# Altium PCB task1.PcbDoc (part 1 of 2)
Units mil, origin at the board's own origin, x right, y up, seen from the top; angles counter-clockwise.
Board outline 13280 x 12290 mil, 2 copper layers (Top Layer, Bottom Layer); 143 components, 138 nets, 540 pads, 213 vias.
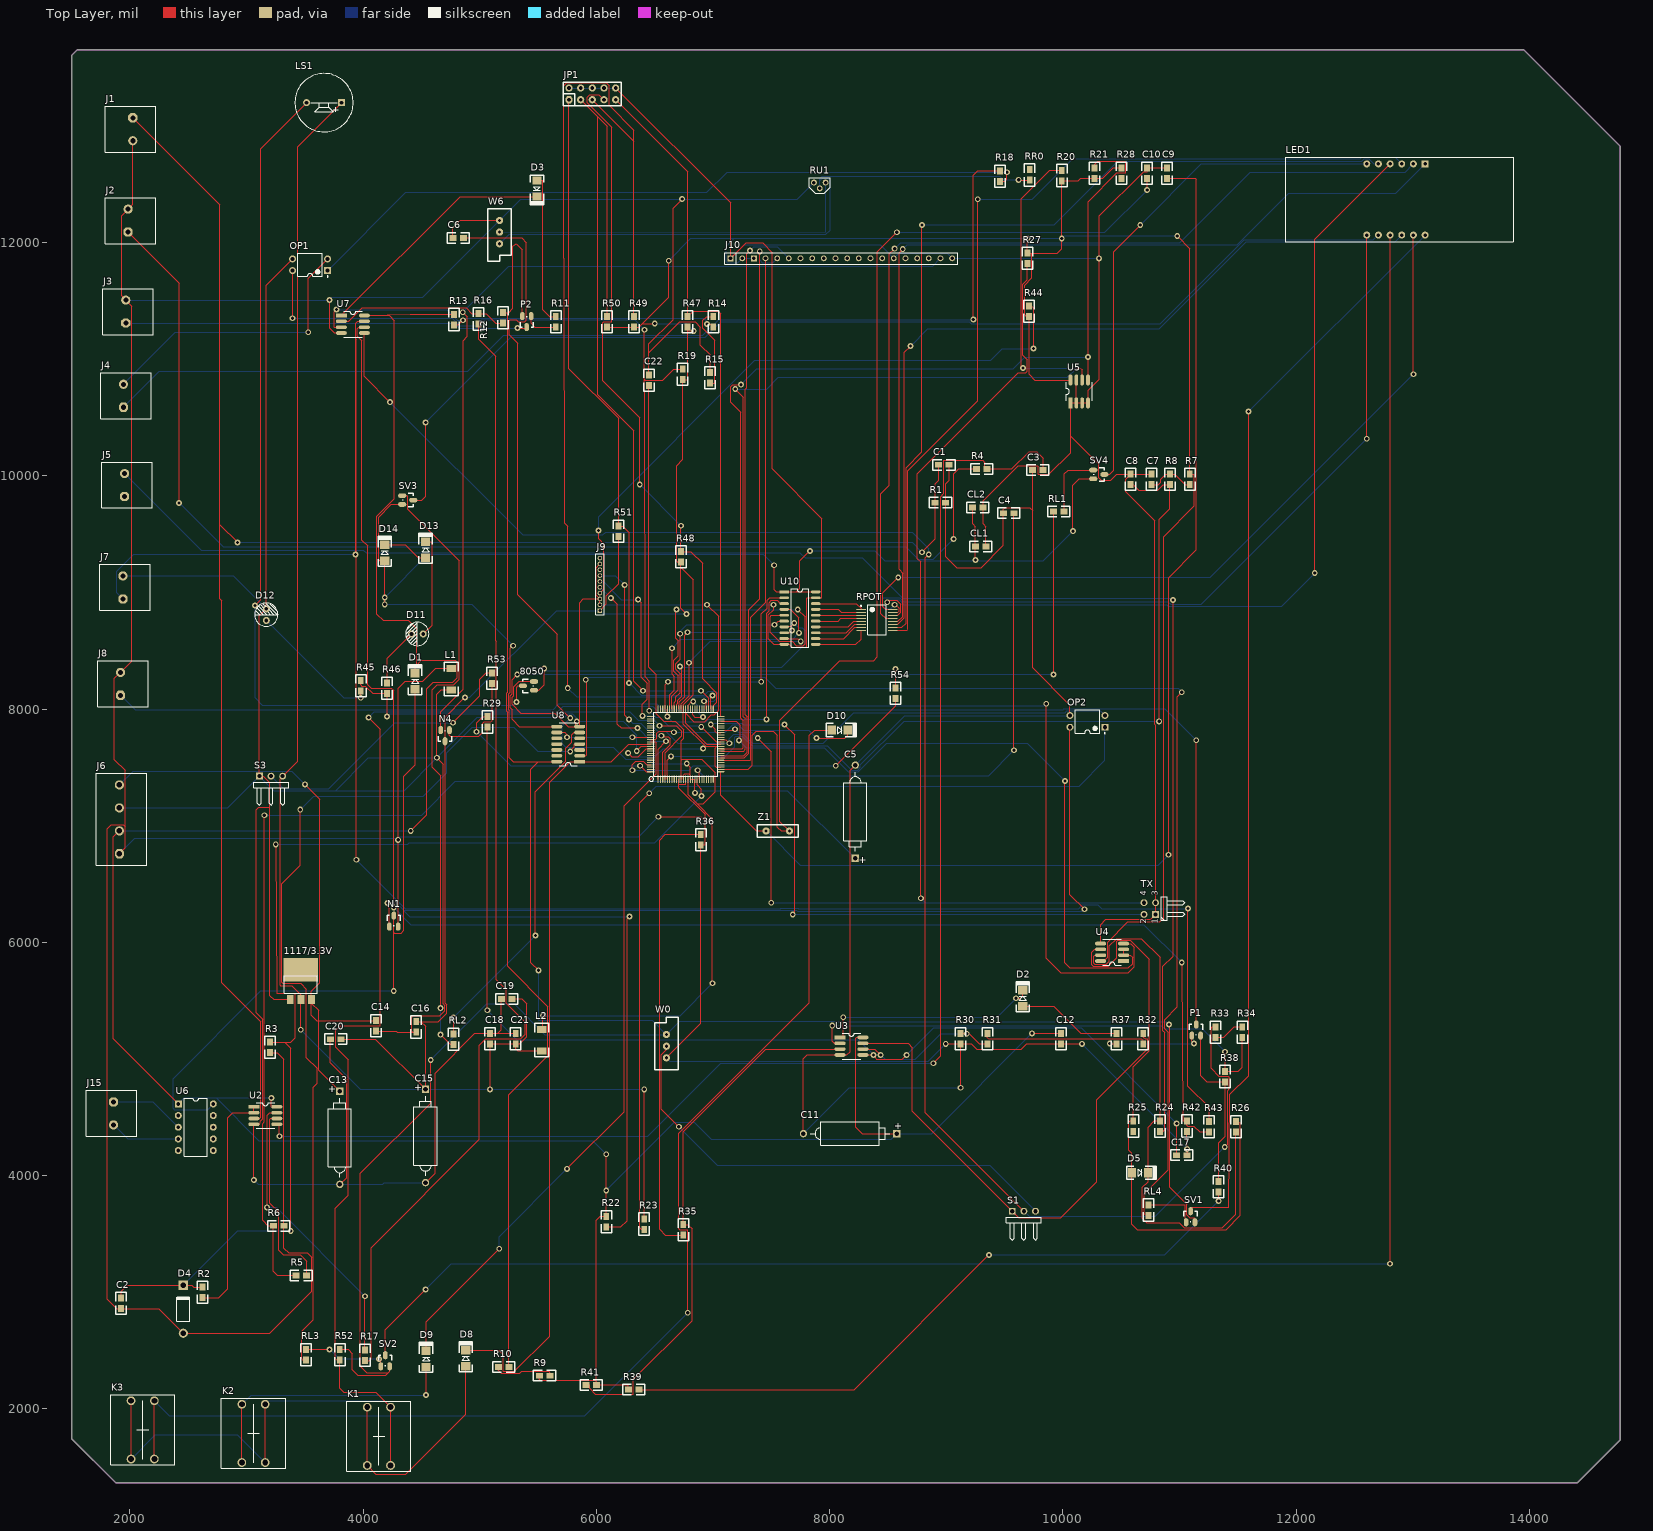
[diagram p0: Top Layer view]
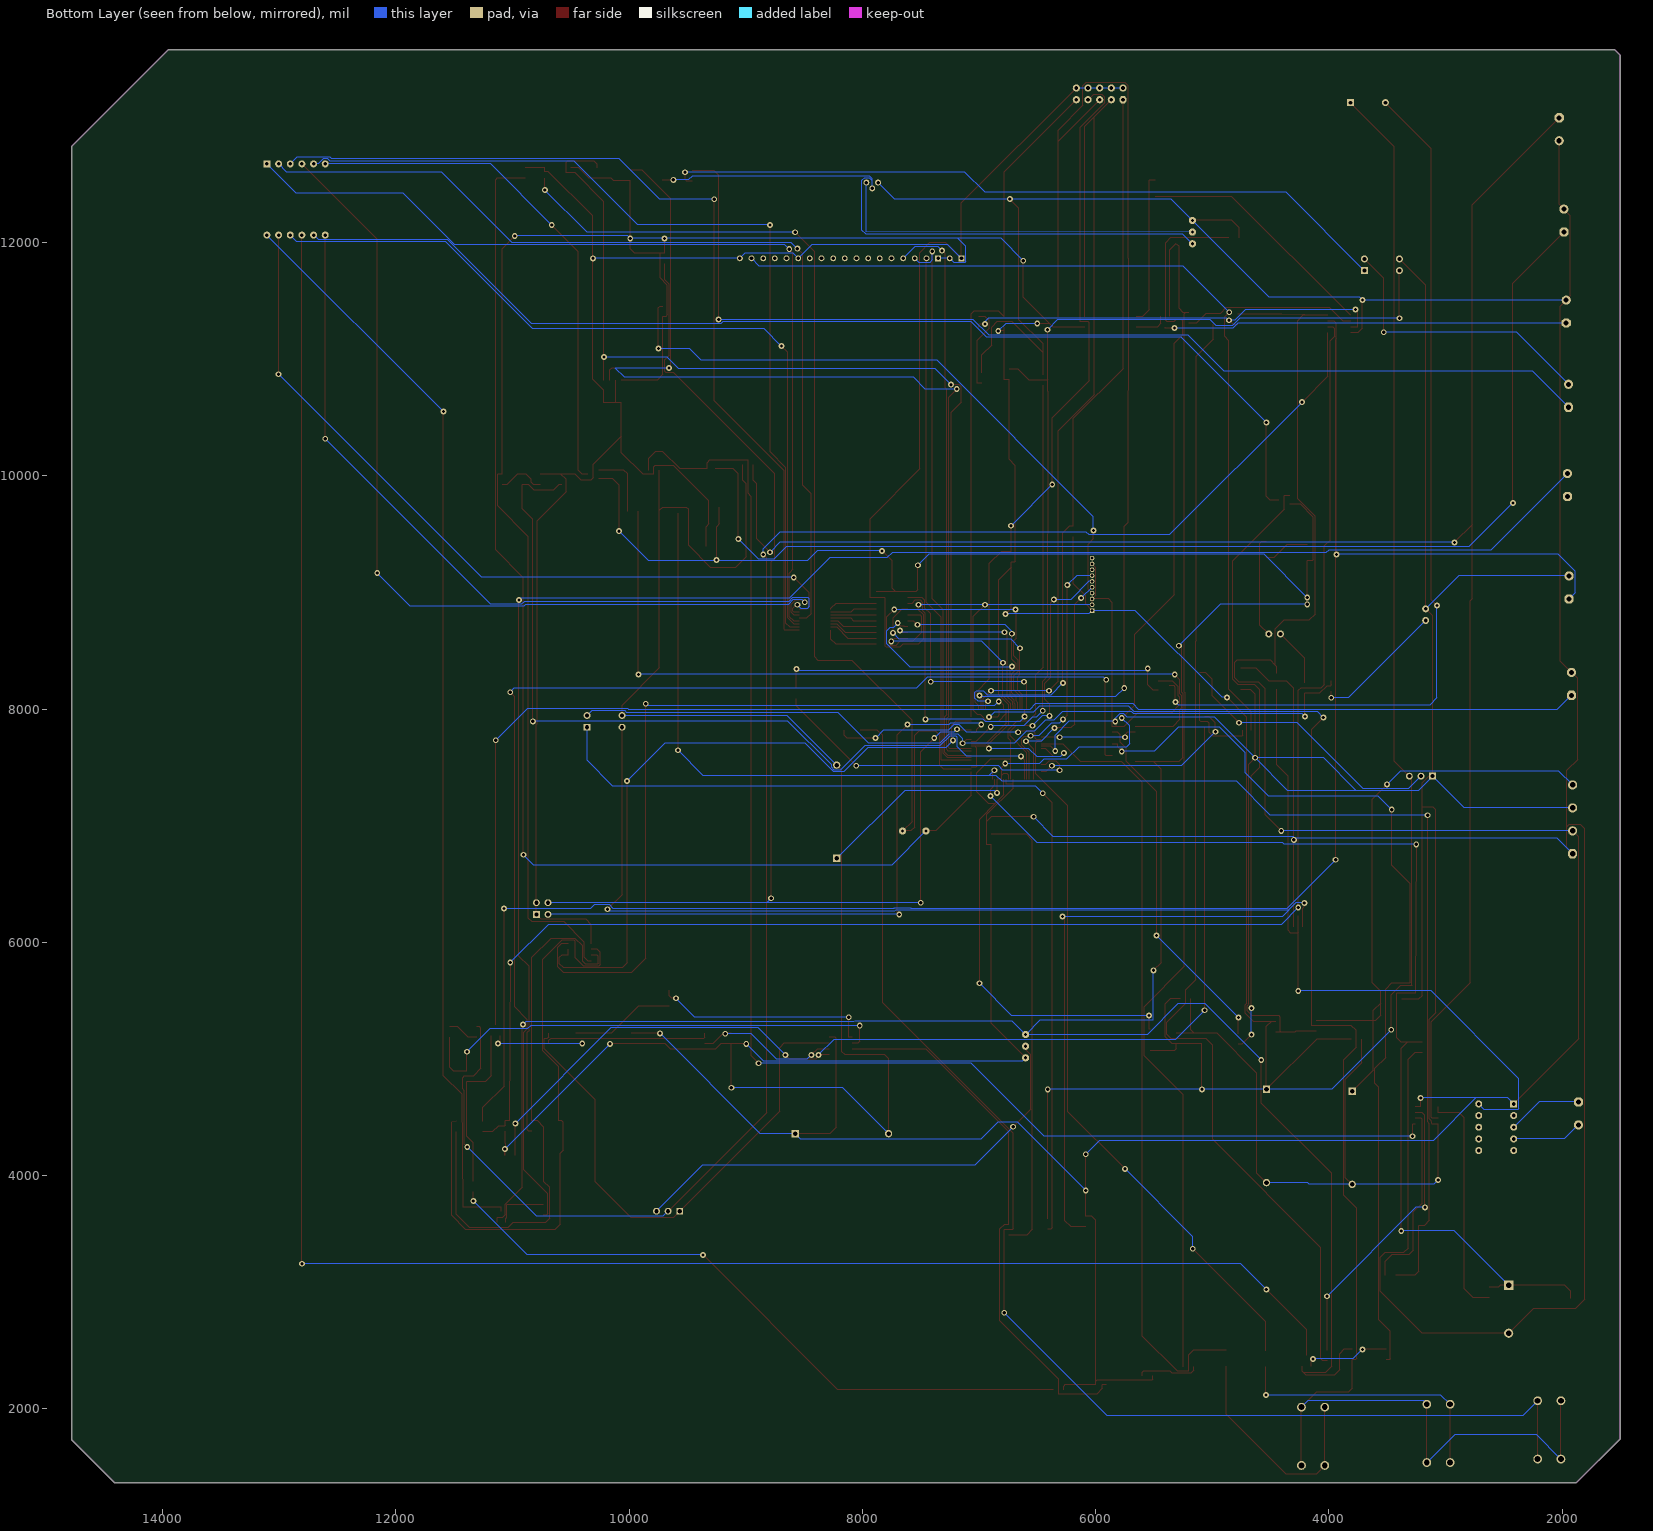
[diagram p1: Bottom Layer view, seen from below]

## Layer stack, top to bottom
Top Solder: solder mask 0.4, Solder Resist, Dk 3.5
Top Layer: signal copper 1.4
Dielectric 1: dielectric 12.6, FR-4, Dk 4.8
Bottom Layer: signal copper 1.4
Bottom Solder: solder mask 0.4, Solder Resist, Dk 3.5

## Board outline
1500,1745 1880,1365 14410,1365 14780,1735 14780,12825 13950,13655 1550,13655 1500,13605

## Design rules (kind name [scope] priority, off if disabled: settings)
Clearance [All] p1: gap=10 ignorepadtopadclearanceinfootprint=FALSE except(0: Arc-Hole Track-Hole SMDPad-Hole THPad-Hole Via-Hole Fill-Hole Poly-Hole Region-Hole Text-Hole)
PolygonConnect [All] p1: connectstyle=Relief reliefconductorwidth=10 reliefentries=4 polygonreliefangle="90 Angle" airgapwidth=10
RoutingVias [All] p1: holewidth=28 width=50 viastyle="Through Hole" minholewidth=28 minwidth=50 maxholewidth=28 maxwidth=50
SolderMaskExpansion [All] p1: expansion=4 istentingtop=FALSE
Width [All] p1: maxlimit=5 minlimit=5 preferedwidth=5 minimp=50.000000 maximp=50.000000 favimp=50.000000
30 further rules are at their usual default settings.

## Components (designator, comment, footprint, x,y, rotation, side; value= is the part's Value field where it differs from the comment)
1117/3.3V "HEADER 3" SOT-223/P2.3 3375.12,5511.47 r0 top
8050 "NPN" SOT-23 5375,8200 r90 top
C1 "104" 0805 8935,10095 r0 top
C2 "104" 0805 1924.82,2949.99 r270 top
C3 "104" 0805 9829.99,10050.18 r180 top
C4 "104" 0805 9579.99,9680.18 r180 top
C5 "Cap Pol2" POLAR0.8 8220,7120 r270 top value=4.7uF
C6 "Cap" 0805 4770.01,12039.82 r0 top value=104
C7 "104" 0805 10760.18,9925.01 r90 top
C8 "104" 0805 10578.15,9925.01 r90 top
C9 "22pF" 0805 10891.85,12639.99 r270 top
C10 "22pF" 0805 10721.85,12639.99 r270 top
C11 "Cap Pol1" POLAR0.8 8175,4360 r0 top value=100uF/25V
C12 "Cap" 0805 9983.15,5130.01 r90 top value=104
C13 "Cap Pol2" POLAR0.8 3800,4325 r90 top value="100pF 16V"
C14 "104" 0805 4109.82,5329.99 r270 top
C15 "Cap Pol2" POLAR0.8 4535,4340 r90 top value="100uF 16V"
C16 "104" 0805 4454.82,5319.99 r270 top
C17 "102" 0805 10975.01,4174.82 r0 top
C18 "104" 0805 5088.15,5130.01 r90 top
C19 "104" 0805 5274.99,5515.18 r180 top
C20 "104" 0805 3809.99,5170.18 r180 top
C21 "104" 0805 5308.15,5130.01 r90 top
C22 "104" 0805 6450.18,10775.01 r90 top
CL1 "104" 0805 9250.01,9394.82 r0 top
CL2 "104" 0805 9225.01,9729.82 r0 top
D1 "4148" D-DO214AC 4445,8170 r90 top
D2 "4148" D-DO214AC 9655.19,5452.08 r90 top
D3 "4148" D-DO214AC 5489.81,12532.92 r270 top
D4 "IN4732" DO-41 2458.15,2855.01 r90 top
D5 "P6KE12AC" D-DO214AC 10592.08,4024.81 r0 top
D8 "4148" D-DO214AC 4880,2365 r90 top
D9 "4148" D-DO214AC 4540,2360 r90 top
D10 "4148" D-DO214AC 8017.08,7819.81 r0 top
D11 "LED(M3)" LED 4515,8645 r180 top
D12 "LED(M3)" LED 3170,8760 r90 top
D13 "4148" D-DO214AC 4535.19,9297.08 r90 top
D14 "4148" D-DO214AC 4185.19,9272.08 r90 top
J1 "接线座" MIP-2 2025,13070 r0 top
J2 "接线座" MIP-2 1985,12090 r180 top
J3 "接线座" MIP-2 1965,11310 r180 top
J4 "接线座" MIP-2 1945,10588.15 r180 top
J5 "CON2" MIP-2 1955,9823.15 r180 top
J6 "CON4" MIP-4 1910,6760 r180 top
J7 "12V OUT" MIP-2 1940,8945 r180 top
J8 "CON2" MIP-2 1920,8118.15 r180 top
J9 "JTAG" MHDR1X10 6030,8845 r90 top
J10 "CON20" SIP20 7150,11865 r0 top
J15 "接线座" MIP-2 1860,4631.85 r0 top
JP1 "IDC10" IDC-10 5765,13225.02 r0 top
K1 "SW-DPST" KEY 6235.13,1515.29 r90 top
K2 "SW-DPST" KEY 5160.13,1540.29 r90 top
K3 "SW-DPST" KEY 9.87,2069.71 r270 top
L1 "500mA磁珠" 1808 4755,8165 r90 top
L2 "500mA磁珠" 1808 5530,5070 r90 top
LED1 "REDCC" SX1 13104.56,12065.73 r270 top
LS1 "SPEAKER" FMQ 3814.81,13200.19 r180 top
N1 "8050" SOT-23 4263.19,6224.81 r0 top
N4 "8050" SOT-23 4701.81,7730.19 r180 top
OP1 "TLP251" DIP-4 3545,11810 r180 top
OP2 "TLP251-1" DIP-4 10210,7895 r180 top
P1 "8550" SOT-23 11143.15,5290.01 r0 top
P2 "8550" SOT-23 5401.81,11280.19 r180 top
R1 "250" 0805 8994.99,9770.18 r180 top
R2 "1K" 0805 2623.15,2955.01 r90 top
R3 "1K" 0805 3200.18,5055.01 r90 top
R4 "1K" 0805 9260.01,10059.82 r0 top
R5 "1K" 0805 3514.99,3145.18 r180 top
R6 "910" 0805 3319.99,3570.18 r180 top
R7 "10K" 0805 11088.15,9925.01 r90 top
R8 "1K" 0805 10918.15,9925.01 r90 top
R9 "0.5" 0805 5599.99,2285.18 r180 top
R10 "62" 0805 5249.99,2360.18 r180 top
R11 "5.1K" 0805 5651.85,11364.99 r270 top
R12 "10K" 0805 5200.18,11310.01 r90 top
R13 "10K" 0805 4780.18,11295.01 r90 top
R14 "39K" 0805 7001.85,11364.99 r270 top
R15 "1K" 0805 6975,10885 r270 top
R16 "39K" 0805 4989.82,11389.99 r270 top
R17 "1K" 0805 4015.18,2415.01 r90 top
R18 "2K" 0805 9459.82,12614.99 r270 top
R19 "2K" 0805 6740.18,10825.01 r90 top
R20 "3K3" 0805 9989.82,12619.99 r270 top
R21 "3.3K" 0805 10271.85,12639.99 r270 top
R22 "3.3K" 0805 6085.18,3560.01 r90 top
R23 "510" 0805 6410.18,3540.01 r90 top
R24 "10" 0805 10833.15,4380.01 r90 top
R25 "10" 0805 10603.15,4380.01 r90 top
R26 "220" 0805 11483.15,4375.01 r90 top
R27 "5K1" 0805 9695,11910 r270 top
R28 "5K1" 0805 10501.85,12639.99 r270 top
R29 "1k" 0805 5064.82,7934.99 r270 top
R30 "10k" 0805 9123.15,5130.01 r90 top
R31 "2K" 0805 9353.15,5130.01 r90 top
R32 "10K" 0805 10688.15,5130.01 r90 top
R33 "39k" 0805 11308.15,5185.01 r90 top
R34 "1k" 0805 11538.15,5185.01 r90 top
R35 "39K" 0805 6745.18,3490.01 r90 top
R36 "1K" 0805 6895.18,6835.01 r90 top
R37 "5.1K" 0805 10458.15,5130.01 r90 top
R38 "10K" 0805 11390.18,4805.01 r90 top
R39 "0.5" 0805 6275.01,2164.82 r0 top
R40 "62.5" 0805 11335.18,3860.01 r90 top
R41 "10K" 0805 5910.01,2204.82 r0 top
R42 "2.2K" 0805 11063.15,4380.01 r90 top
R43 "3K" 0805 11253.15,4375.01 r90 top
R44 "4.7K" 0805 9709.82,11454.99 r270 top
R45 "1K" 0805 3980,8245 r270 top
R46 "1K" 0805 4205.18,8135.01 r90 top
R47 "5K1" 0805 6781.85,11364.99 r270 top
R48 "5K1" 0805 6724.82,9349.99 r270 top
R49 "5K1" 0805 6321.85,11364.99 r270 top
R50 "5K1" 0805 6091.85,11364.99 r270 top
R51 "5K1" 0805 6189.82,9569.99 r270 top
R52 "10K" 0805 3800.18,2420.01 r90 top
R53 "1K" 0805 5104.82,8309.99 r270 top
R54 "1k" 0805 8565.18,8090.01 r90 top
RL1 "1.3K" 0805 9920.01,9694.82 r0 top
RL2 "1.3K" 0805 4774.82,5214.99 r270 top
RL3 "1.3K" 0805 3510.18,2420.01 r90 top
RL4 "1.3K" 0805 10735.18,3660.01 r90 top
RPOT "Res Pack4" SSOP16_N 8405,8765 r0 top value=330
RR0 "1K/0.5V" 0805 9714.82,12624.99 r270 top
RU1 "LM336/2.5V" TO-92A 7865,12515 r0 top
S1 "SW3" HDR1x3H 9565,3695 r0 top
S3 "CON3" HDR1x3H 3110,7425 r0 top
SV1 "9012" SOT-23 11095,3690 r0 top
SV2 "9012" SOT-23 4190,2455 r0 top
SV3 "9012" SOT-23 4424.81,9791.81 r270 top
SV4 "9012" SOT-23 10349.81,10011.81 r270 top
TX "IDC4" HDR2x2H 10795,6240 r90 top
U2 "LM358" SO8 3063.15,4590.01 r0 top
U3 "LM358" SO8 8088.15,5185.01 r0 top
U4 "MAX3485" SO8 10520,5839.99 r180 top
U5 "24C02" SO8 10064.99,10625 r90 top
U6 "RELAY(12V)" DIP10 2415,4615 r0 top
U7 "LM358" SO8 3813.15,11375.01 r0 top
U8 "7407" SO14 5856.7,7550 r180 top
U10 "74HC245" SOJ-20 7610,9005 r0 top
W0 "102" VR5 6600,5010 r90 top
W6 "RESISTOR TAPPED" VR5 5170,12190 r270 top
Z1 "11.0592M" RAD0.2 7455,6955.01 r0 top
? "C8051F020" C8051F020 6529.57,7400.14 r90 top

## Footprints (in the part's own frame and the unit in brackets; to place one, negate y for a bottom-side part, rotate by r counter-clockwise, add the part's x,y. Pads: shape width x height; smd on the part's side, far side on the other; paste and mask are expansions set on the pad)
0805 [mil]
  rect 60x50 smd: 1(-0.01,0.18) 2(89.99,0.18)
  silkscreen extent -50,-45 140,45
1808 [mil]
  rect 60x80 smd: 1(0,0) 2(185,0)
  silkscreen extent -50,-60 235,60
C8051F020 [mil]
  rect 65x9 smd: 1(0.02,0)
  oval 65x9 smd: 2(0.02,-19.69) 3(0.02,-39.37) 4(0.02,-59.06) 5(0.02,-78.74) 6(0.02,-98.43) 7(0.02,-118.11) 8(0.02,-137.8) 9(0.02,-157.48) 10(0.02,-177.16) 11(0.02,-196.85) 12(0.02,-216.53) 13(0.02,-236.22) 14(0.02,-255.9) 15(0.02,-275.59) 16(0.02,-295.27) 17(0.02,-314.96) 18(0.02,-334.65) 19(0.02,-354.33) 20(0.02,-374.02) 21(0.02,-393.7) 22(0.02,-413.39) 23(0.02,-433.07) 24(0.02,-452.76) 25(0.02,-472.44) 51(598.44,-472.44) 52(598.44,-452.76) 53(598.44,-433.07) 54(598.44,-413.39) 55(598.44,-393.7) 56(598.44,-374.02) 57(598.44,-354.33) 58(598.44,-334.65) 59(598.44,-314.96) 60(598.44,-295.27) 61(598.44,-275.59) 62(598.44,-255.9) 63(598.44,-236.22) 64(598.44,-216.53) 65(598.44,-196.85) 66(598.44,-177.16) 67(598.44,-157.48) 68(598.44,-137.8) 69(598.44,-118.11) 70(598.44,-98.43) 71(598.44,-78.74) 72(598.44,-59.06) 73(598.44,-39.37) 74(598.44,-19.69) 75(598.44,0)
  oval 9x65 smd: 26(63.01,-535.43) 27(82.7,-535.43) 28(102.38,-535.43) 29(122.07,-535.43) 30(141.75,-535.43) 31(161.44,-535.43) 32(181.12,-535.43) 33(200.81,-535.43) 34(220.49,-535.43) 35(240.18,-535.43) 36(259.86,-535.43) 37(279.55,-535.43) 38(299.23,-535.43) 39(318.92,-535.43) 40(338.6,-535.43) 41(358.29,-535.43) 42(377.97,-535.43) 43(397.66,-535.43) 44(417.34,-535.43) 45(437.03,-535.43) 46(456.71,-535.43) 47(476.4,-535.43) 48(496.08,-535.43) 49(515.77,-535.43) 50(535.45,-535.43) 76(535.45,62.99) 77(515.77,62.99) 78(496.08,62.99) 79(476.4,62.99) 80(456.71,62.99) 81(437.03,62.99) 82(417.34,62.99) 83(397.66,62.99) 84(377.97,62.99) 85(358.29,62.99) 86(338.6,62.99) 87(318.92,62.99) 88(299.23,62.99) 89(279.55,62.99) 90(259.86,62.99) 91(240.18,62.99) 92(220.49,62.99) 93(200.81,62.99) 94(181.12,62.99) 95(161.44,62.99) 96(141.75,62.99) 97(122.07,62.99) 98(102.38,62.99) 99(82.7,62.99) 100(63.01,62.99)
  silkscreen extent -20,-512 575,79
D-DO214AC [mm]
  rect 1.8x2 smd: 1(-0.005,0.005) 2(3.503,0.005)
  silkscreen extent -1.14,-1.47 5.33,1.45
DIP10 [mil]
  rect 60x60 hole 32: 1(0,0)
  round 60 hole 32: 2(0,-100) 3(0,-200) 4(0,-300) 5(0,-400) 6(300,-400) 7(300,-300) 8(300,-200) 9(300,-100) 10(300,0)
  silkscreen extent 50,-448 250,50
DIP-4 [mm] "DIP; 4 Leads; Row Spacing 7.62 mm; Pitch 2.54 mm"
  rect 1.5x1.5 hole 0.9: 1(-3.81,1.27)
  round 1.5 hole 0.9: 2(-3.81,-1.27) 3(3.81,-1.27) 4(3.81,1.27)
  silkscreen extent -3.94,-2.55 2.65,2.69, body extent -3.15,-2.5 3.15,2.5, height 5.6
DO-41 [mm] "Diode, Axial; Body 5.2 x 2.7 mm (LxDia. max), Lead Dia. 0.86 mm (max)"
  round 2 hole 1.2: 1(-5.23,0)
  rect 2x2 hole 1.2: 2(5.23,0)
  silkscreen extent -2.65,-1.4 2.75,1.4
FMQ [mil]
  rect 60x60 hole 32: 1(-0.19,0.19)
  round 60 hole 32: 2(299.81,0.19)
  silkscreen extent -100,-250 400,250
HDR1x3H [mm] "Connector; Header; 3 Position; Right Angle"
  rect 1.5x1.5 hole 0.9: 1(0,0)
  round 1.5 hole 0.9: 2(2.54,0) 3(5.08,0)
  silkscreen extent -1.27,-6.35 6.35,-1.27
HDR2x2H [mm] "Connector; Header; 2x2 Position; Right Angle"
  rect 1.5x1.5 hole 0.9: 1(0,0)
  round 1.5 hole 0.9: 2(0,2.54) 3(2.54,0) 4(2.54,2.54)
  silkscreen extent -1.27,-6.35 3.81,-1.27
IDC-10 [mil]
  oct 62x62 hole 32: 1(0,-0.02)
  round 62 hole 32: 2(0,99.98) 3(100,-0.02) 4(100,99.98) 5(200,-0.02) 6(200,99.98) 7(300,-0.02) 8(300,99.98) 9(400,-0.02) 10(400,99.98)
  silkscreen extent -50,-50 450,150
KEY [mil]
  round 75 hole 50: 1(-0.29,2200.13) 2(-0.29,2000.13) 3(499.71,2200.13) 4(499.71,2000.13)
  silkscreen extent -50,1825 550,2375
LED [mil]
  round 60 hole 32: 1(0,0) 2(100,0)
  silkscreen extent -50,-100 150,100
MHDR1X10 [mm] "Connector; Header; 10 Position"
  rect 1x1 hole 0.6: 1(0,0)
  round 1 hole 0.6: 2(1.27,0) 3(2.54,0) 4(3.81,0) 5(5.08,0) 6(6.35,0) 7(7.62,0) 8(8.89,0) 9(10.16,0) 10(11.43,0)
  silkscreen extent -0.9,-0.9 12.33,0.9
MIP-2 [mm]
  oct 2x2 hole 1.1: 1(0,0)
  round 2 hole 1.1: 2(0,-5)
  silkscreen extent -6,-7.5 5,2.5
MIP-4 [mm]
  oct 2x2 hole 1.2: 1(0,0.011)
  round 2 hole 1.2: 2(0,-4.989) 3(0,-9.989) 4(0,-14.989)
  silkscreen extent -6,-17.49 5,2.51
POLAR0.8 [mm] "Polarized Capacitor; 2 Leads"
  rect 1.6x1.6 hole 1: 1(10.16,0)
  round 1.6 hole 1: 2(-10.16,0)
  silkscreen extent -8.64,-2.54 8.64,2.54
RAD0.2 [mil]
  round 62 hole 28: 1(0,-0.01) 2(200,-0.01)
  silkscreen extent -75,-55 275,55
SIP20 [mil]
  rect 50x50 hole 32: 1(0,0) 3(200,0)
  round 50 hole 32: 2(100,0) 4(300,0) 5(400,0) 6(500,0) 7(600,0) 8(700,0) 9(800,0) 10(900,0) 11(1000,0) 12(1100,0) 13(1200,0) 14(1300,0) 15(1400,0) 16(1500,0) 17(1600,0) 18(1700,0) 19(1800,0) 20(1900,0)
  silkscreen extent -50,-50 1950,50
SO8 [mm]
  rect 2.4x0.8 smd: 1(0,0)
  oval 2.4x0.8 smd: 2(0,-1.27) 3(0,-2.54) 4(0,-3.81) 5(5,-3.81) 6(5,-2.54) 7(5,-1.27) 8(5,0)
  silkscreen extent 0.5,-4.71 4.5,0.89
SO14 [mm]
  rect 2.4x0.8 smd: 1(-0.004,0)
  oval 2.4x0.8 smd: 2(-0.004,-1.27) 3(-0.004,-2.54) 4(-0.004,-3.81) 5(-0.004,-5.08) 6(-0.004,-6.35) 7(-0.004,-7.62) 8(4.996,-7.62) 9(4.996,-6.35) 10(4.996,-5.08) 11(4.996,-3.81) 12(4.996,-2.54) 13(4.996,-1.27) 14(4.996,0)
  silkscreen extent 0.5,-8.49 4.5,0.86
SOJ-20 [mil]
  rect 80x24 smd: 1(0,0)
  oval 80x24 smd: 2(0,-50) 3(0,-100) 4(0,-150) 5(0,-200) 6(0,-250) 7(0,-300) 8(0,-350) 9(0,-400) 10(0,-450) 11(270,-450) 12(270,-400) 13(270,-350) 14(270,-300) 15(270,-250) 16(270,-200) 17(270,-150) 18(270,-100) 19(270,-50) 20(270,0)
  silkscreen extent 60,-475 210,25
SOT-23 [mil]
  oval 40x70 smd: 1(-38.19,-89.81) 2(36.81,-89.81) 3(-0.19,5.19)
  silkscreen extent -58,-84 57,6
SOT-223/P2.3 [mil]
  rect 59x79 smd: 1(0,-0.01) 2(90.55,-0.01) 3(181.1,-0.01)
  rect 300x200 smd: 4(89.88,253.53)
  silkscreen extent -49,52 231,202
SSOP16_N [mm] "SOP, 16-Leads, Body 6.2x5.3mm, Pitch 0.65mm, IPC Medium Density"
  oval 2.1x0.254 smd: 1(-3.45,2.275) 2(-3.45,1.625) 3(-3.45,0.975) 4(-3.45,0.325) 5(-3.45,-0.325) 6(-3.45,-0.975) 7(-3.45,-1.625) 8(-3.45,-2.275) 9(3.45,-2.275) 10(3.45,-1.625) 11(3.45,-0.975) 12(3.45,-0.325) 13(3.45,0.325) 14(3.45,0.975) 15(3.45,1.625) 16(3.45,2.275)
  silkscreen extent -3.57,-3.25 2,3.25, body extent -2.7,-3.25 2.7,3.25, height 2
SX1 [mil]
  rect 60x60 hole 30: 1(-609.27,0.44)
  round 60 hole 30: 2(-609.27,-99.56) 3(-609.27,-199.56) 4(-609.27,-299.56) 5(-609.27,-399.56) 6(-609.27,-499.56) 7(0.73,-499.56) 8(0.73,-399.56) 9(0.73,-299.56) 10(0.73,-199.56) 11(0.73,-99.56) 12(0.73,0.44)
  silkscreen extent -665,-1200 57,758
TO-92A [mil]
  round 50 hole 30: 1(0,0) 2(50,-50) 3(100,0)
  silkscreen extent -40,-90 140,40
VR5 [mil]
  round 62 hole 28: 1(0,0) 2(100,0) 3(200,0)
  silkscreen extent -100,-100 350,100

## Part data
8050: "NPN Transistor"
C1 C2 C3 C4 C7 C8 C9 C10 C14 C16 C17 C18 C19 C20 C21 C22 CL1 CL2: library part CAP, "Capacitor"
C5 C13 C15: "Polarized Capacitor (Axial)", LatestRevisionDate=17-Jul-2002, LatestRevisionNote="Re-released for DXP Platform.", PackageDescription="Polarized Capacitor; 2 Leads", PackageReference=POLAR0.8, Published=8-Jun-2000, Publisher="Altium Limited"
C6 C12: "Capacitor", LatestRevisionDate=17-Jul-2002, LatestRevisionNote="Re-released for DXP Platform.", PackageDescription="Radial Cap, Thru-Hole; 2 Leads; 0.3 in Pin Spacing", PackageReference=RAD-0.3, Published=8-Jun-2000, Publisher="Altium Limited"
C11: "Polarized Capacitor (Radial)", LatestRevisionDate=17-Jul-2002, LatestRevisionNote="Re-released for DXP Platform.", PackageDescription="Polarized Capacitor (Radial); 2 Leads", PackageReference=RB7.6-15, Published=8-Jun-2000, Publisher="Altium Limited"
D1 D2 D3 D5 D8 D9 D10 D13 D14: library part DIODE, "Diode"
D4: library part "DIODE SCHOTTKY", "Schottky Diode"
D11 D12: library part LED
J1 J2 J3 J4 J7 J15: library part CON2, "Connector"
J5 J6 J8 J10 S3: "Connector"
J9: library part 10PIN
JP1: library part "HEADER 5X2"
L1 L2: library part INDUCTOR1
LED1: "Common Cathhode Seven-Segment Display, Right Hand Decimal"
N1 N4: library part NPN, "NPN Transistor"
OP1 OP2: library part OPTOISO1, "Optoisolator"
P1 P2 SV1 SV2 SV3 SV4: library part PNP, "PNP Transistor"
R1 R2 R3 R4 R5 R6 R7 R8 R9 R10 R11 R12 R13 R14 R15 R16 R17 R18 R19 R20 R21 R22 R23 R24 R25 R27 R28 R29 R30 R31 R32 R33 R34 R35 R36 R37 R38 R39 R40 R41 R42 R43 R44 R45 R46 R47 R48 R49 R50 R51 R52 R53 R54 RL1 RL2 RL3 RL4 RR0: library part RES2
R26: library part RES1
RPOT: "Isolated Resistor Network", Code_IPC=SOP65P780-16, Code_JEDEC=MO-150-AC, LatestRevisionDate=29-May-2009, LatestRevisionNote="IPC-7351 Footprint Added.", PackageDescription="16-Pin Plastic Small Outline Package 0.65 mm Pitch", PackageReference=SSOP16, PackageVersion=Oct-2003, Published=24-Mar-1999, Publisher="Altium Limited"
RU1: library part ProE5.tmp_LM336_6
TX: library part "HEADER 2X2"
U2: library part MC34002
U4: library part MAX488
U5: library part 24C04
U6: library part RELAY
U10: library part "HEADER 10X2"
W0: library part "RESISTOR TAPPED"
Z1: library part CRYSTAL
?: library part C8051F020.2

## Via types
v1: diameter 50, hole 28, Top Layer to Bottom Layer, 213 vias

## Nets (pads, with @x,y where several pads share a name; then routed paths per layer and width w, separated by ;. In a path a pad name is that pad's centre, name@x,y a point inside that pad or via, vN(x,y) a via of type N, cw(c..) or ccw(c..) an arc to the next point about the centre after c; other vN are vias at no path point)
+12: C11.1 C12.2 D1.2 J6.2 R9.2 R13.2 R22.2 R39.1 R41.2 U2.8 U3.8 U6.1 U7.8 | length 24717.5
  Top Layer w5: J6.2@1910,6956.4 1858,6904.4 1858,5172 U6.1@2415,4615 ; v1(3213,4666) 3213,4590 U2.8@3260,4590 ; v1(4408,6956) 4545,7093 4545,8176 4599,8230 4768,8230 4808,8270 4808,8400 4790,8418 4497.81,8418 4458,8378.19 ; D1.2@4444.81,8307.92 4444.81,8365 4458,8378.19 ; R13.2@4780,11385 4405,11385 U7.8@4010,11375 4224,11375 4268,11331 4268,9804 4118,9654 4118,8814 4171,8761 4385,8761 4458,8688 4458,8378.19 ; R9.2@5510,2285 5510,2255 5520,2245 5992,2245 6000,2237 ; v1(6085,4184) v1(6085,3873) R22.2@6085,3650 6034,3650 6000,3616 6000,2237 ; R39.1@6275,2165 6275,2194 6264,2205 R41.2@6000,2205 6000,2237 ; U3.8@8285,5185 8234,5185 8225,5176 8225,4416 8281,4360 C11.1@8575,4360 ; v1(9734,5220) C12.2@9982.97,5220
  Bottom Layer w5: J6.2@1910,6956.4 1958.6,6956.4 v1(4408,6956) ; U6.1@2415,4615 2466,4666 2739,4666 ; v1(3213,4666) 2739,4666 ; v1(6085,3873) 6669,4457 6840,4457 6984,4313 8528,4313 C11.1@8575,4360 8874,4360 v1(9734,5220) ; v1(6085,4184) 5969,4300 3105,4300 2739,4666
+12V: RR0.1
A8: ?.88 D8.2 U8.1 | length 6754.6
  Top Layer w5: D8.2@4879.81,2502.92 5164.08,2502.92 5203,2464 5203,2322.5 5297.5,2322.5 5598,2623 5598,7374 5774,7550 U8.1@5856.85,7550 6129,7550 6278.37,7699.37 ?.88@6466.57,7699.37
A9: ?.87 D9.2 | length 6078.8
  Top Layer w5: D9.2@4539.81,2497.92 4539.81,2746 v1(5167,3373.19) ; v1(5747,4058) 6237,4548 6237,7171 6512,7446 6512,7711.06 6504,7719.06 ?.87@6466.57,7719.06
  Bottom Layer w5: v1(5167,3373.19) 5167,3478 v1(5747,4058)
A10: ?.86 D10.2 | length 1871.6
  Top Layer w5: ?.86@6466.57,7738.74 6506.04,7738.74 6519.3,7752 6519.3,7792 6536.92,7809.62 6656.38,7809.62 v1(6664,7802) ; v1(7887,7752) 8131,7752 8155,7776 D10.2@8155,7820
  Bottom Layer w5: v1(6664,7802) 7104.5,7802 7168,7865.5 7216,7865.5 7264,7817.5 7821.5,7817.5 v1(7887,7752)
A11: ?.85 U8.9 | length 837
  Top Layer w5: U8.9@5660,7800 5728,7800 5747,7781 v1(5747,7758.43) ; v1(6308.43,7758.43) ?.85@6466.57,7758.43
  Bottom Layer w5: v1(5747,7758.43) v1(6308.43,7758.43)
A/MO: ?.40 OP2.2 R45.1 R46.1 | length 7082.5
  Top Layer w5: R45.1@3980.18,8245.01 3980.18,8208 3990.18,8198 4018,8198 4081,8135 R46.1@4205,8135 v1(4205,7936) ; ?.40@7065,7738.74 7108.26,7738.74 v1(7140,7707)
  Bottom Layer w5: v1(4205,7936) 4229.71,7960.71 5674.23,7960.71 5689.02,7975.5 6285.79,7975.5 6357.52,7903.77 6432.62,7903.77 6526.77,7809.62 6594.3,7809.62 6696.92,7707 v1(7140,7707) 7140,7746.5 7178,7784.5 7258.5,7784.5 7336,7707 7943,7707 8207,7971 10018,7971 10034.03,7987.03 10317.97,7987.03 OP2.2@10360,7945
ADC0: ?.18 C2.1 D4.2 R2.2 R3.2 | length 9571.6
  Top Layer w5: C2.1@1925,2950 1925,3008 1977.92,3060.92 D4.2@2458.15,3060.92 2532,3060.92 2547.92,3045 R2.2@2622.97,3045 ; R3.2@3200,5145 3328,5145 ; v1(3250,6840.5) 3260,5564 3418,5564 3418,5184 3379,5145 3328,5145 ; v1(3380,3526) 3380,5093 3328,5145 ; ?.18@6864.21,7400.16 6864.21,7350.79 6901,7314 v1(6901,7254.41)
  Bottom Layer w5: D4.2@2458.15,3060.92 2923.23,3526 v1(3380,3526) ; v1(3250,6840.5) 4380.31,6840.5 4393.81,6854 6500.59,6854 v1(6901,7254.41)
ADC1: ?.19 C4.1 R5.2 R6.2 | length 13031.3
  Top Layer w5: v1(3153,7090.52) 3153,4460.14 3138,4445.14 3138,3616 3184,3570 R6.2@3230,3570 3230,3179 3264,3145 R5.2@3425,3145 ; v1(6868,7476) 6883.9,7460.1 ?.19@6883.9,7400.16 ; v1(9580,7647) C4.1@9580,9680
  Bottom Layer w5: v1(3153,7090.52) 4500.52,7090.52 4790,7380 6802,7380 6851,7429 6915,7429 ; v1(6868,7476) 6915,7429 ; v1(9580,7647) 9362,7429 6915,7429
AGND: ?.10 ?.13 C1.2 C2.2 C3.2 C4.2 C5.2 C6.1 C11.2 C12.1 C17.2 C22.2 D4.1 J1.2 J2.2 J3.2 J6.1 J8.2 L1.2 N1.2 OP2.3 R1.1 R3.1 R6.1 R15.1 R30.1 R36.1 R42.1 RU1.1 U3.4 U7.4 W0.1 W6.1 | length 52078.4
  Top Layer w5: J6.1@1910,6759.55 1962,6811.55 1962,6992 ; J1.2@2025,12873.15 2025,12326.85 J2.2@1985,12286.85 1929,12230.85 1929,11542.85 J3.2@1965,11506.85 2017,11454.85 2017,8412 J8.2@1920,8315 1868,8263 1868,7568 1962,7474 1962,6992 ; R3.1@3200,5055 3264,5055 3320,4999 R6.1@3320,3570 3320,3377 3360,3337 3520,3337 3558,3299 3558,3008 3199.1,2649.1 D4.1@2458.15,2649.1 2247.25,2860 C2.2@1925,2860 1887,2860 1808,2939 1808,6976 1841,7009 1945,7009 1962,6992 ; v1(3712,11507) 3712,11266 3753,11225 U7.4@3813.15,11225 ; N1.2@4300,6135 v1(4300,6879) 4300,8179 4360,8239 4513,8239 4624,8350 L1.2@4755,8350 ; C6.1@4770,12040 4770,12128 4832,12190 W6.1@5170,12190 ; C22.2@6450,10865 6450,11055 ; v1(6531,7077) 6896,7077 6933,7040 ; W0.1@6600,5010 6895,5305 R36.1@6895,6835 6933,6835 6933,7040 ; ?.10@6706.73,7400.16 6706.73,7356.05 ; v1(6735,12373) 6658,12296 6658,11340 6450,11132 6450,11055 ; ?.13@6765.79,7400.16 6765.79,7355 6707.79,7355 6706.73,7356.05 ; R15.1@6975.18,10885.01 6975.18,11037.82 6892,11121 6892,11276 6848,11320 6715,11320 6450,11055 ; C11.2@7775,4360 7775,5002 7808,5035 U3.4@8088.15,5035 8148,5035 8176,5063 8176,7476 C5.2@8220,7520 ; v1(8995,5130) R30.1@9122.97,5130 ; C1.2@9024.99,10095.18 9024.99,9962.99 8995,9933 R1.1@8995,9770 8995,9306 9088,9213 9298,9213 9490,9405 C4.2@9490,9680 9490,9712 9506,9728 9717,9728 9740,9705 ; v1(9123,4753) R30.1@9122.97,5130 ; C3.2@9740,10050 9740,9705 ; OP2.3@10060,7945 10060,8034 9740,8354 9740,9705 ; v1(10163,5130) C12.1@9982.97,5130 9691,5130 9644,5083 9261,5083 9214,5130 R30.1@9122.97,5130 ; R42.1@11062.97,4380 11062.97,4279.03 11063.97,4227.98 C17.2@11065,4175 v1(11065,4228) ; 6706.73,7356.05 6706.73,7323.27 6933,7097 6933,7040
  Bottom Layer w5: J6.1@1910,6759.55 2042.45,6892 4287,6892 v1(4300,6879) 4300,6907 6361,6907 v1(6531,7077) ; J3.2@1965,11506.85 3711.85,11506.85 v1(3712,11507) 3737,11532 4512,11532 W6.1@5170,12190 5353,12373 v1(6735,12373) 7723,12373 RU1.1@7865,12515 ; W0.1@6600,5010 6629,4981 8846,4981 v1(8995,5130) ; C11.2@7775,4360 8168,4753 v1(9123,4753) ; C5.2@8220,7520 8645,7945 OP2.3@10060,7945 ; v1(10163,5130) v1(11065,4228)
ALAM: ?.97 R54.1 | length 2776.7
  Top Layer w5: v1(6308.11,7476.5) 6308.11,7522.2 6337.78,7551.88 6402.33,7551.88 6432,7522.2 ?.97@6466.57,7522.2 ; v1(8052,7514) 8565,8027 R54.1@8565,8090
  Bottom Layer w5: v1(6308.11,7476.5) 6794.32,7476.5 6831.82,7514 v1(8052,7514)
AV3: ?.11 ?.14 C22.1 L2.2 | length 7807.5
  Top Layer w5: L2.2@5530,5255 5540,5255 5540,5371 v1(5542,5373) ; C22.1@6450,10775 6450,8357 6512,8295 6512,7958.7 6576.2,7894.5 6675,7894.5 6748.5,7821 6748.5,7751 6726.42,7728.92 6726.42,7561.05 ; ?.11@6726.42,7400.16 6726.42,7561.05 ; ?.14@6785.47,7400.16 6785.47,7267 6863.97,7188.5 ; v1(6995,5649) 6995,7057.47 6863.97,7188.5 ; 6726.42,7561.05 6735.87,7570.5 6904.5,7570.5 7020,7455 7020,7290.9 6917.6,7188.5 6863.97,7188.5
  Bottom Layer w5: v1(5542,5373) 6719,5373 v1(6995,5649)
CS: ?.31 J10.4 | length 4610.5
  Top Layer w5: ?.31@7065,7561.57 7316.97,7561.57 7321.5,7566.1 7321.5,8786.5 7450,8915 J10.4@7450,11865
D0: ?.72 U10.2 | length 1919.6
  Top Layer w5: ?.72@6588.62,7998.58 6588.62,8208.62 v1(6614,8234) ; v1(7414,8234) 7414,8815.85 7465,8866.85 7465,8932 7488,8955 U10.2@7610,8955
  Bottom Layer w5: v1(6614,8234) v1(7414,8234)
D1: ?.71 U10.3 | length 2097.2
  Top Layer w5: v1(6608.31,7936) ?.71@6608.31,7998.58 ; v1(7458.5,7912) 7458.5,8822.5 7480,8844 7480,8912 7501,8933 7550,8933 7578,8905 U10.3@7610,8905
  Bottom Layer w5: v1(6608.31,7936) 6650.72,7893.58 6942.74,7893.58 6961.16,7912 v1(7458.5,7912)
D2: ?.70 U10.4 | length 1976.7
  Top Layer w5: ?.70@6627.99,7998.58 6627.99,8121.95 6668,8161.95 6668,8279.05 6648.55,8298.5 v1(6648.55,8522.55) ; U10.4@7610,8855 7664,8855 7737,8782 v1(7737,8654)
  Bottom Layer w5: v1(6648.55,8522.55) 6724.42,8598.42 7681.42,8598.42 v1(7737,8654)
D3: ?.69 U10.5 | length 2897.5
  Top Layer w5: ?.69@6647.68,7998.58 6647.68,8111.57 6702.05,8165.94 6702.05,8288 6663.55,8326.5 6663.55,8419.63 6702.5,8458.58 6702.5,8586.85 6680.38,8608.97 6680.38,8847.38 v1(6687,8854) ; U10.5@7610,8805 7501,8805 7488.5,8792.5 7488.5,8659.5 7568,8580 7677.89,8580 7714.5,8543.39 7772.89,8543.39 7789.5,8560 7789.5,8791.5 v1(7727,8854)
  Bottom Layer w5: v1(6687,8854) v1(7727,8854)
D4: ?.68 U10.6 | length 1649.6
  Top Layer w5: ?.68@6667.36,7998.58 6667.36,8055.48 6682.37,8070.49 6682.37,8105.32 6717.05,8140 6717.05,8302.95 6678.55,8341.45 6678.55,8389.63 6718,8429.08 v1(6718,8646) ; v1(7526,8723) 7558,8755 U10.6@7610,8755
  Bottom Layer w5: v1(6718,8646) 6718,8666.73 6774.27,8723 v1(7526,8723)
D5: ?.67 U10.7 | length 1890.9
  Top Layer w5: ?.67@6687.05,7998.58 6687.05,8041.31 6697.37,8051.63 6697.37,8077.43 6732.05,8112.12 6732.05,8353.95 6720,8366 v1(6716.05,8366) ; U10.7@7610,8705 7640.5,8705 7640.5,8712.5 7670.5,8712.5 v1(7696,8738)
  Bottom Layer w5: v1(6716.05,8366) 6722.33,8359.72 7589.22,8359.72 7789.5,8560 7789.5,8672 7764.05,8697.45 7736.55,8697.45 v1(7696,8738)
D6: ?.66 U10.8 | length 1670.5
  Top Layer w5: ?.66@6706.73,7998.58 6706.73,8033 6712.37,8038.63 6712.37,8062.43 6755.5,8105.57 6755.5,8632.5 v1(6782,8659) ; U10.8@7610,8655 7658,8655 v1(7678,8675)
  Bottom Layer w5: v1(6782,8659) 7662,8659 v1(7678,8675)
D7: ?.65 U10.9 | length 1619.4
  Top Layer w5: ?.65@6726.42,7998.58 6726.42,8029 6728,8030.58 6728,8047 6797,8116 6797,8398 v1(6793,8398) ; U10.9@7610,8605 7728,8605 v1(7752,8581)
  Bottom Layer w5: v1(6793,8398) 6976,8581 v1(7752,8581)
D/A: ?.100 R29.1 | length 1828.1
  Top Layer w5: v1(4972,7806) 4972,7883 5024,7935 R29.1@5065,7935 ; v1(6375,7514) 6425.85,7463.15 ?.100@6466.57,7463.15
  Bottom Layer w5: v1(4972,7806) 5264,7514 v1(6375,7514)
DE: ?.48 U4.2 U4.3 | length 5822.9
  Top Layer w5: ?.48@7065,7896.22 7200,7896.22 7235.06,7861.16 7235.06,7745.06 v1(7222,7732) ; v1(10017,7384) 10017,5824 10060,5781 10560,5781 10597,5818 10597,5872 10579,5890 U4.2@10520,5890 U4.3@10520,5940
  Bottom Layer w5: v1(7222,7732) 7286,7668 7953,7668 8160,7461 8246.21,7461 8491.21,7706 9695,7706 v1(10017,7384)
DV3: 1117/3.3V.2 ?.28 ?.37 ?.64 ?.90 C15.1 C16.1 C18.1 C19.1 C20.1 C21.1 J9.1 J10.2 J10.3 L2.1 LS1.1 N4.3 R7.2 R19.1 R20.2 R21.2 R23.2 R27.1 R28.1 R44.2 R47.2 R48.2 R49.2 R50.2 R51.2 S3.3 U4.8 U5.8 | length 43318.9
  Top Layer w5: v1(3465.67,5251.33) 1117/3.3V.2@3465.67,5511.46 3465.67,5552.33 3389,5629 3289.26,5629 3287.5,5630.76 3287.5,7402.5 S3.3@3310,7425 3438,7553 3438,12823 LS1.1@3815,13200 ; C20.1@3810,5170 4105,5170 C15.1@4535,4740 4535,5280 4495,5320 ; C16.1@4455,5320 4495,5320 ; v1(4873,8100) 4702,7929 N4.3@4702,7725 4702,5480 4716.5,5465.5 4716.5,5390.5 4646,5320 4495,5320 ; v1(5087.97,4740) C18.1@5087.97,5130 C21.1@5307.97,5130 ; C19.1@5275,5515 5360,5515 5403,5472 5403,5189 5344,5130 C21.1@5307.97,5130 ; L2.1@5530,5070 5325.97,5070 5307.97,5088 C21.1@5307.97,5130 ; J9.1@6030,8845 6086.38,8901.38 6086.38,8970.24 6190,9073.86 R51.2@6190,9480 ; R50.2@6092.03,11275 R49.2@6322.03,11275 6363,11275 6394,11306 ; v1(6272,7624) 6304,7592 6360,7592 6428,7660 ?.90@6466.57,7660 ; R23.2@6410,3630 v1(6410,4740) ; v1(6500,11306) 6394,11306 ; v1(6620,11845) 6620,11532 6394,11306 ; v1(6772,8816) 6725,8863 6725,9215 ; 6782,10825 R19.1@6740,10825 6740,10141 6687,10088 6687,9269 6696,9260 R48.2@6725,9260 6725,9215 ; 6782.03,10825.03 6782.03,11242 ; R47.2@6782.03,11275 6782.03,11242 ; v1(6835,11242) 6782.03,11242 ; v1(6915,7662) 6932.69,7679.69 6937.31,7679.69 ; ?.28@7065,7502.52 7027.48,7502.52 7018,7512 7018,7665.69 7032,7679.69 ; ?.37@7065,7679.69 7032,7679.69 ; v1(9695.18,12036) R27.1@9695.18,11910.01 9733,11910.01 ; U5.8@10065,10821.85 9760,10821.85 9710,10871.85 R44.2@9710,11365 9687.46,11365 9672,11380.46 9672,11636 9733,11697 9733,11910.01 ; U4.8@10323.15,5840 10351,5840 10383,5872 10383,6001.25 10557.75,6176 10830,6176 10862.5,6208.5 10862.5,9479.5 11126,9743 11126,10015 R7.2@11087.97,10015 11087.97,11949.03 v1(10980,12057) ; R28.1@10502.03,12640 10432,12640 10342,12550 R21.2@10272.03,12550 10151,12550 10131,12530 R20.2@9990,12530 v1(9990,12036) 9990,11948.01 9952,11910.01 9733,11910.01 ; 6725,9215 6831,9109 6831,8123 6746.1,8038.1 ?.64@6746.1,7998.58 6746.1,7870.9 6937.31,7679.69 ; 6937.31,7679.69 7032,7679.69
  Bottom Layer w5: v1(3465.67,5251.33) 3977,4740 C15.1@4535,4740 v1(5087.97,4740) v1(6410,4740) ; v1(4873,8100) 4914.25,8100 5659.25,8845 J9.1@6030,8845 6059,8816 v1(6772,8816) ; v1(6272,7624) 6304,7592 6502,7592 6572,7662 v1(6915,7662) ; v1(6500,11306) 6771,11306 v1(6835,11242) ; v1(6620,11845) 6811,12036 7180,12036 ; J10.3@7350,11865 J10.2@7250,11865 7212,11827 7120,11827 7112,11835 7112,11968 7180,12036 ; v1(10980,12057) 10011,12057 v1(9990,12036) v1(9695.18,12036) 7180,12036
GND: 1117/3.3V.1 8050.2 ?.38 ?.63 ?.89 C7.2 C8.2 C9.1 C10.1 C13.2 C14.2 C15.2 C16.2 C18.2 C19.2 C20.2 C21.2 CL1.2 CL2.2 D12.2 J6.3 J7.2 J9.2 J9.3 J9.9 J10.1 J10.15 J10.20 JP1.2 JP1.4 JP1.6 JP1.8 JP1.10 L1.1 OP1.3 S3.1 TX.1 TX.3 U2.4 U4.5 U5.1 U5.2 U5.3 U5.4 U5.7 U8.7 U10.10 U10.19 | length 53725.3
  Top Layer w5: v1(3063,3962) 3063,4440 U2.4@3063.15,4440 3115,4440 3123,4471 3138,4486 3138,5342 3083,5397 3083,7139 3104,7160 3200,7160 ; 1117/3.3V.1@3375.12,5511.46 3375.12,5511 3232,5511 3200,5543 3200,7160 ; OP1.3@3395,11860 3170,11635 D12.2@3170,8860 3110,8800 S3.1@3110,7425 3142,7425 3200,7367 3200,7160 ; C20.2@3720,5170 3720,4966 3859,4827 3859,3984 C13.2@3800,3925 ; C14.2@4110,5240 4283,5240 4293,5230 4427,5230 ; C16.2@4455,5230 4427,5230 ; C15.2@4535,3940 4617,4022 4617,4879 4958,5220 C18.2@5087.97,5220 5152,5220 ; L1.1@4755,8165 4669,8165 4632,8128 v1(4632,7583) 4687,7528 4687,5473 4701.5,5458.5 4701.5,5413.5 4657,5369 4426,5369 4417,5360 4417,5240 4427,5230 ; C19.2@5185,5515 5185,5253 5152,5220 ; C21.2@5307.97,5220 5152,5220 ; 8050.2@5464.81,8236.81 5336.81,8236.81 5292,8192 5292,8114.82 5277,8099.82 5277,8039.82 5350.82,7966 5641.95,7966 5757.95,7850 U8.7@5821,7850 ; v1(5832,7894) 5821,7883 U8.7@5821,7850 ; U8.7@5856.85,7850 U8.7@5856,7850 ; J9.2@6030,8895 J9.3@6030,8945 ; J9.9@6030,9245 5997,9212 5997,8978 J9.3@6030,8945 ; JP1.10@6165,13325 7150,12340 J10.1@7150,11865 7283.33,11998.33 7424.67,11998.33 7508,11915 7508,10059 7933,9634 7933,8955 U10.19@7880,8955 7808,8955 7804.5,8951.5 7804.5,8540.89 7792,8528.39 7681,8528.39 7654.39,8555 U10.10@7610,8555 7520,8555 7473.5,8601.5 7473.5,8807.5 7519,8853 v1(7519,8895) ; v1(6346,7640) 6385.69,7679.69 ?.89@6466.57,7679.69 ; ?.63@6765.79,7998.58 6765.79,7963.21 ; v1(6948,8895) 7048.5,8794.5 7048.5,7988.5 7009.65,7949.65 6986.74,7949.65 6930.67,7893.58 6835.42,7893.58 6765.79,7963.21 ; ?.38@7065,7699.37 6945.89,7699.37 6765.79,7879.48 6765.79,7963.21 ; CL1.2@9340,9395 9340,9563 9315,9588 CL2.2@9315,9730 9315,9788 9615,10088 9779,10088 9787,10080 9787,10012 9878,10012 10065,10199 10065,10340.5 ; U5.7@10115,10821.85 U5.2@10115,10625 ; v1(10310,11865) 10310,10829 ; U4.5@10323.15,5990 10323,5990 10323,6152 10368,6197 10752,6197 TX.1@10795,6240 TX.3@10795,6340 10795,7864 10787,7872 10787,9616 10540,9863 10540,9970 C8.2@10585,10015 ; C7.2@10760,10015 10668,10015 C8.2@10585,10015 ; C9.1@10892.03,12640 C10.1@10722.03,12640 10722.03,12609 10691,12609 10311,12229 10310.74,11865 10310,10829 ; U8.7@5821,7850 U8.7@5856,7850 ; U8.7@5856,7850 5856,8913 5888,8945 J9.3@6030,8945 ; 10065,10340.5 U5.1@10065,10625 U5.2@10115,10625 ; 10065,10340.5 10307.5,10098 10307.5,9984 10327.5,9964 10410,9964 10461,10015 C8.2@10577.97,10015 C8.2@10585,10015 ; U5.2@10115,10625 U5.3@10165,10625 U5.4@10215,10625 10215,10734 10310,10829
  Bottom Layer w5: J6.3@1910,7153.25 2838.25,7153.25 S3.1@3110,7425 3233,7302 3763,7302 ; J7.2@1940,9141.85 2888.15,9141.85 D12.2@3170,8860 ; v1(3063,3962) 3100,3925 C13.2@3800,3925 4168,3925 4183,3940 C15.2@4535,3940 ; JP1.2@5765,13325 JP1.4@5865,13325 JP1.6@5965,13325 JP1.8@6065,13325 JP1.10@6165,13325 ; J9.2@6030,8895 v1(6948,8895) v1(7519,8895) ; v1(6346,7640) 6346,7776 6228,7894 v1(5832,7894) 5832,7920.5 5792,7960.5 5757.5,7960.5 5728,7931 4980,7931 v1(4632,7583) ; J10.1@7150,11865 7268,11983 8432,11983 J10.15@8550,11865 8591.5,11906.5 9008.5,11906.5 J10.20@9050,11865 v1(10310,11865) ; 3763,7302 4351,7302 v1(4632,7583) ; 3763,7302 4044,7583 v1(4632,7583)
INT1: ?.60 K1.2 K1.4 K2.2 K2.4 K3.2 K3.4 R52.1 | length 13805.5
  Top Layer w5: K3.4@2010,1570 K3.2@2010,2070 ; K2.2@3160,1540 K2.4@3160,2040 ; v1(4047,7928) 4148,7827 4148,5287 3806,5287 3767,5248 3767,5101 3874,4994 3874,3833 3762,3721 3762,2432 3774,2420 R52.1@3800,2420 3800,2176 3833,2143 4107,2143 K1.4@4235,2015 K1.2@4235,1515 ; ?.60@6824.84,7998.58 6824.84,7952 6844.84,7932 v1(6913,7932)
  Bottom Layer w5: K3.4@2010,1570 2218,1778 2922,1778 K2.2@3160,1540 ; K2.4@3160,2040 3188,2068 4182,2068 K1.4@4235,2015 ; v1(4047,7928) 4095,7976 5668,7976 5716,8024 6485,8024 6535,7974 6871,7974 v1(6913,7932)
LED21: LED1.12 SV1.3 | length 9390
  Top Layer w5: SV1.3@11094.81,3695.19 11094.81,3731 11422,3731 11432,4697 11592,4857 v1(11592,10552)
  Bottom Layer w5: v1(11592,10552) LED1.12@13105,12065
LED22: LED1.9 SV2.3 | length 17887.7
  Top Layer w5: SV2.3@4189.81,2460.19 4189.81,2677.81 v1(4536,3024) ; v1(12805,3245) LED1.9@12805,12065
  Bottom Layer w5: v1(4536,3024) 4757,3245 v1(12805,3245)